# Altium PCB PDBMCU.PcbDoc (part 3 of 3)
Units mil, origin at the board's own origin, x right, y up, seen from the top; angles counter-clockwise.
Board outline 5245 x 4685 mil, 4 copper layers (Top Layer, Second Layer, Third Layer, Bottom Layer), stack 60.674 mil thick; 139 components, 73 nets, 640 pads, 472 vias.
Unrouted connection lines stored in the file: 2.
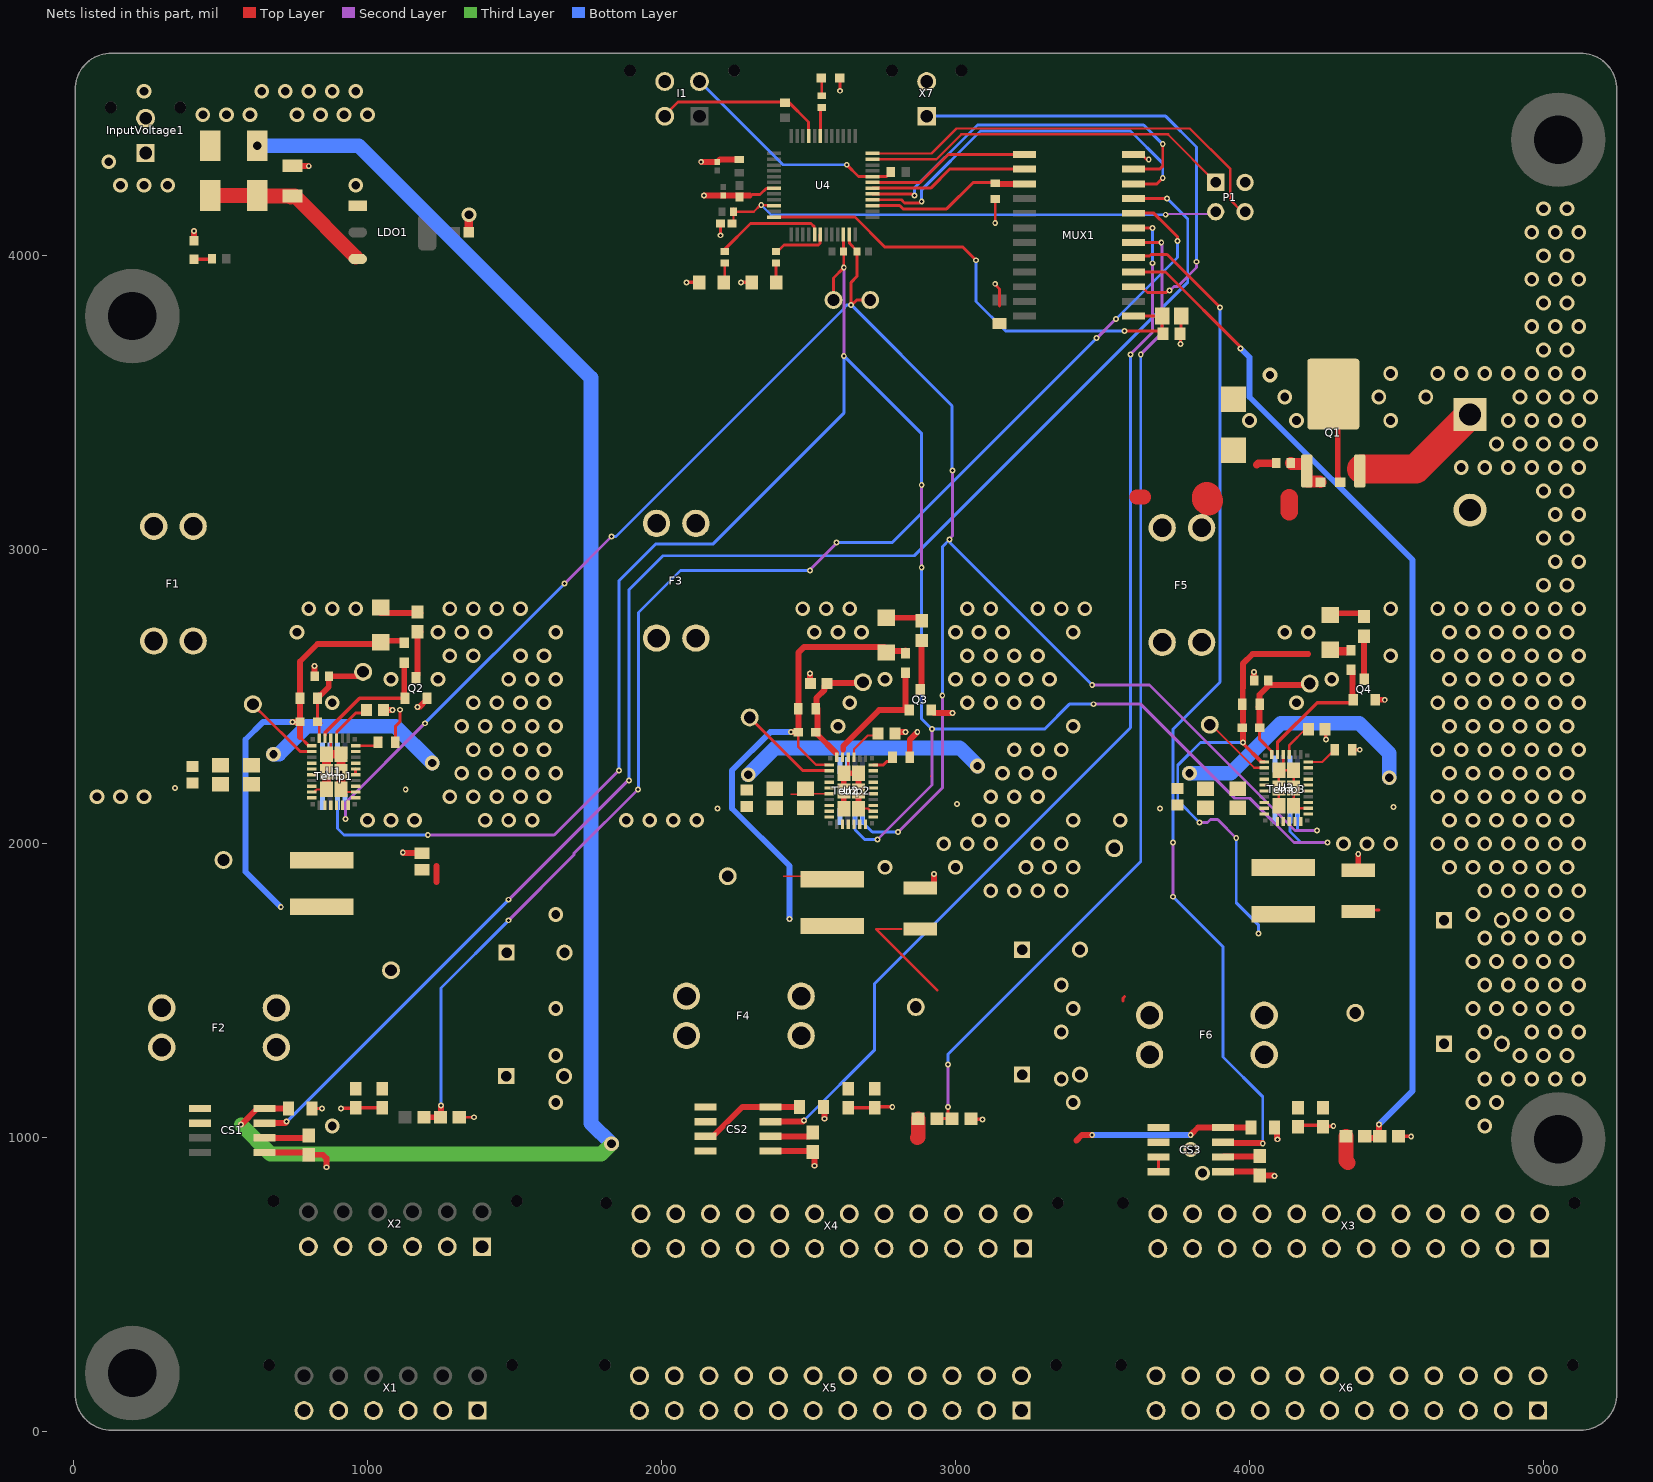
[diagram p4: the nets of this part, all layers, seen from the top]

## Via types
v1: diameter 50, hole 30, Top Layer to Bottom Layer, tented both sides, 342 vias
v2: diameter 20, hole 10, Top Layer to Bottom Layer, tented both sides, 123 vias
v3: diameter 50, hole 28, Top Layer to Bottom Layer, tented both sides, 7 vias

## Nets (pads, with @x,y where several pads share a name; then routed paths per layer and width w, separated by ;. In a path a pad name is that pad's centre, name@x,y a point inside that pad or via, vN(x,y) a via of type N, cw(c..) or ccw(c..) an arc to the next point about the centre after c; other vN are vias at no path point) (continued)
5V: C4.1 C5.1 C6.1 CS1.8 CS2.3 CS2.4 CS2.8 CS3.8 D2.1 R4.2 X4.P$13 X4.P$14 X4.P$15 X4.P$16 X4.P$17 X4.P$18 X4.P$19 X4.P$20 X4.P$21 X4.P$22 X4.P$23 X4.P$24 X5.P$13 X5.P$14 X5.P$15 X5.P$16 X5.P$17 X5.P$18 X5.P$19 X5.P$20 X5.P$21 X5.P$22 X5.P$23 X5.P$24 | length 6635.6
  Top Layer w20: v2(570,1045) 625,1100 CS1.8@650,1100 C4.1@730.71,1100 ; CS2.3@2150,1005 2175,1005 2275,1105 CS2.8@2370,1105 C5.1@2470,1105 ; 3410.58,990.58 3430,1010 v2(3465,1010) ; v2(3800,1010) 3825,1035 C6.1@4004.65,1035
  Top Layer w50: 2870,1000 2872.9,1002.9 R4.2@2872.9,1065
  Third Layer w50: v2(570,1045) 670,945 1795,945 v1(1830,980)
  Bottom Layer w20: v2(3465,1010) v2(3800,1010)
  Bottom Layer w50: v1(625,4374.65) 970.35,4374.65 1760,3585 1760,1050 v1(1830,980)
12V: CS3.3 CS3.4 R5.2 X3.P$13 X3.P$14 X3.P$15 X3.P$16 X3.P$17 X3.P$18 X3.P$19 X3.P$20 X3.P$21 X3.P$22 X3.P$23 X3.P$24 X6.P$13 X6.P$14 X6.P$15 X6.P$16 X6.P$17 X6.P$18 X6.P$19 X6.P$20 X6.P$21 X6.P$22 X6.P$23 X6.P$24 | length 142.9
  Top Layer w10: CS3.4@3690.08,885 CS3.3@3690.08,935
  Top Layer w50: R5.2@4327.9,1005 4327.9,922.1 4335,915
Analog_In: C43.1 C44.2 MUX1.1 U4.12 | length 1721.1
  Top Layer w10: U4.12@2382.68,4131.73 2657.68,4131.73 2759.41,4030 3025,4030 v2(3070,3985) ; v2(3575,3745) C44.2@3702.49,3745 ; MUX1.1@3605.04,3795 C43.1@3702.49,3795 C44.2@3702.49,3745 ; C44.2@3706.46,3735 3702.49,3738.97 C44.2@3702.49,3745
  Bottom Layer w10: v2(3070,3985) 3070,3845 3170,3745 v2(3575,3745)
CS_1: CS1.7 MUX1.9 | length 5133.4
  Top Layer w10: MUX1.9@3605.04,4195 v2(3720,4195)
  Top Layer w20: CS1.7@650.98,1050 720,1050 v2(725,1055)
  Second Layer w10: v2(1480,1810) 1883.09,2213.09 1888.09,2213.09 v2(1890,2215)
  Bottom Layer w10: v2(725,1055) v2(1480,1810) ; v2(1890,2215) 1890,2865 2005,2980 2860,2980 3790,3910 3790,4125 v2(3720,4195)
CS_2: CS2.7 MUX1.7 | length 3708.3
  Top Layer w10: MUX1.7@3605.04,4095 v2(3670,4095)
  Top Layer w20: CS2.7@2370,1055 2480.76,1055 v2(2484.79,1059.03)
  Second Layer w10: v2(3595,3665) 3595,3665.36 3670,3740.36 v2(3670,3975)
  Bottom Layer w10: v2(2484.79,1059.03) 2725,1299.24 2725,1525 3595,2395 v2(3595,3665) ; v2(3670,3975) v2(3670,4095)
CS_3: CS3.7 MUX1.5 | length 3545.5
  Top Layer w10: MUX1.5@3605.04,3995 3609.8,3999.76 3659.41,3999.76 3664.64,4005 3720,4005 v2(3900,3825)
  Top Layer w20: CS3.7@3910.55,985 3913.05,982.5 v2@4045,982.5
  Second Layer w10: v2(3740,1820) v2(3740,2005)
  Bottom Layer w10: v2(3740,1820) 3910,1650 3910,1275 4045,1140 v2(4045,981.26) ; v2(3740,2005) 3740,2390 3900,2550 v2(3900,3825)
Enable: MUX1.15 R32.2 U4.27 | length 560.8
  Top Layer w10: U4.27@2717.32,4171.1 2810.1,4171.1 2821.2,4160 2970,4160 3060,4250 3130.59,4250 R32.2@3135,4245.59
  Top Layer w20: R32.2@3135.59,4245 MUX1.15@3234.96,4245
GND: "PWR GOOD1.1" BLED1.1 C1.2 C2.2 C3.2 C4.2 C5.2 C6.2 C7.1 C8.2 C9.2 C10.2 C11.2 C12.2 C13.2 C14.2 C16.1 C17.1 C18.2 C19.2 C20.2 C21.2 C22.2 C23.2 C24.2 C26.1 C27.1 C28.2 C29.2 C30.2 C31.2 C32.2 C33.2 C34.2 C36.1 C37.2 C38.1 C39.2 C40.2 C41.1 C42.1 C43.2 C44.1 C45.1 C46.2 CS1.5 CS2.5 CS3.5 D1.2 GLED1.1 I1.P$4 InputVoltage1.P$2 LDO1.1 MUX1.12 P1.2 Q1.3 Q2.2 Q3.2 Q4.2 R2.2 R6.1 R7.1 R8.1 R10.1 R11.1 R15.1 R16.1 R20.1 R21.1 R32.1 RLED1.1 Temp1.4 Temp1.5 Temp1.6 Temp1.7 Temp2.4 Temp2.5 Temp2.6 Temp3.4 Temp3.5 Temp3.7 U1.8 U1.9 U1.10 U1.17 U1.18 U1.19 U1.30 U1.33 U1.34 U1.35 U1.36 U1.37 U1.38 U2.8 U2.9 U2.10 U2.17 U2.18 U2.19 U2.30 U2.33 U2.34 U2.35 U2.36 U2.37 U2.38 U3.8 U3.9 U3.10 U3.17 U3.18 U3.19 U3.30 U3.33 U3.34 U3.35 U3.36 U3.37 U3.38 U4.7 X1.P$1 X1.P$2 X1.P$3 X1.P$4 X1.P$5 X1.P$6 X2.P$1 X2.P$2 X2.P$3 X2.P$4 X2.P$5 X2.P$6 X3.P$1 X3.P$2 X3.P$3 X3.P$4 X3.P$5 X3.P$6 X3.P$7 X3.P$8 X3.P$9 X3.P$10 X3.P$11 X3.P$12 X4.P$1 X4.P$2 X4.P$3 X4.P$4 X4.P$5 X4.P$6 X4.P$7 X4.P$8 X4.P$9 X4.P$10 X4.P$11 X4.P$12 X5.P$1 X5.P$2 X5.P$3 X5.P$4 X5.P$5 X5.P$6 X5.P$7 X5.P$8 X5.P$9 X5.P$10 X5.P$11 X5.P$12 X6.P$1 X6.P$2 X6.P$3 X6.P$4 X6.P$5 X6.P$6 X6.P$7 X6.P$8 X6.P$9 X6.P$10 X6.P$11 X6.P$12 X7.P$2 | length 4631.6
  Top Layer w8: U1.9@810.31,2176.29 U1.9@810.5,2176.1 821,2176.1 822.5,2177.6 822.5,2180.31 827.19,2185 U1.37@860,2185 ; U1.33@860,2305 875.16,2320.16 U1.30@875.16,2359 ; U1.38@910,2185 918.9,2176.1 U1.18@959.5,2176.1 ; U2.37@2611.1,2111.1 U2.37@2620,2120 ; U2.35@2620,2175.85 2622.52,2178.37 U2.35@2620,2180.89 ; U2.33@2620,2240 2635.16,2255.16 U2.30@2635.16,2294 ; U2.38@2670,2120 2702.81,2120 2707.5,2115.31 2707.5,2112.6 2709,2111.1 U2.18@2719.5,2111.1 ; v2(3135,4111.88) R32.1@3135,4193.36 R32.1@3135,4194.41 ; U3.37@4091.1,2121.1 U3.37@4100,2130 v2(4100,2190) U3.33@4100,2250 ; U3.30@4115.16,2304 4115.16,2265.16 U3.33@4100,2250 ; U3.18@4199.5,2121.1 4158.9,2121.1 U3.38@4150,2130 v2(4150,2190) U3.34@4150,2250 U3.33@4100,2250
  Top Layer w10: C7.1@396.46,2215 C7.1@405,2206.46 ; C9.2@610,2210.32 C9.2@610.32,2210 ; C4.2@811.42,1100 v2(845,1100) ; R10.1@1084.68,2345 R10.1@1094.53,2354.84 ; R10.1@1094.53,2345 R10.1@1094.53,2354.84 ; v2(1110,2456.11) 1110,2415.15 1094.76,2399.91 1094.76,2355.08 R10.1@1094.53,2354.84 ; R6.1@1327.1,1070 v2(1362.1,1070) ; v2(2200,4070) 2200.35,4070.35 2200.35,4109.65 C41.1@2200.71,4110 ; 2307.41,4206.92 2308.75,4208.26 2335.38,4208.26 2356.37,4229.25 2381.77,4229.25 U4.7@2382.68,4230.16 ; v2(2606.5,4561.5) GLED1.1@2606.5,4605 ; v2(3135,3905) 3135,3902.29 3150,3887.29 3150,3829.29 ; MUX1.12@3632.6,4345 3650.28,4327.32 v2(3657.32,4327.32) ; C43.2@3763.54,3791.03 C43.2@3767.51,3795 ; v2(3765,3700) 3765,3733.54 C44.1@3763.54,3735 3767.51,3738.97 C43.2@3767.51,3791.03
  Top Layer w12: v2(910,1100) 957.56,1100 C13.2@960,1102.44 C12.2@1050,1102.44 ; v2(2085,3910) BLED1.1@2128.66,3910 ; v2(2270,3910) RLED1.1@2307.32,3910 ; C22.2@2635,1102.44 C23.2@2725,1102.44 2727.56,1105 v2(2785,1105) ; R7.1@3052.1,1065 3053.13,1063.97 3091.07,1063.97 v2(3092.21,1062.83) ; C32.2@4150.79,1042.44 C33.2@4250,1042.44 ; C33.2@4250,1037.44 4252.56,1040 v2(4285,1040) ; C36.1@4257.09,2390 4260,2387.09 v2(4260,2355) ; R20.1@4349.53,2320 v2(4375,2320) ; R8.1@4507.1,1005 v2(4550,1005)
  Top Layer w20: 410,4051.5 v2(410,4085) ; CS1.5@650.24,950 C1.2@788.97,950 ; C45.1@745,4306.18 798.82,4306.18 v2(800,4305) ; C1.2@800,942.49 848.28,942.49 860,930.77 v2(860,900) ; v2(820,2605) 820,2570.39 R11.1@820.39,2570 ; C16.1@1053.54,2455 v2(1085,2455) ; v2(1120,1970) 1121.41,1968.59 C14.2@1185,1968.59 ; v2(1170,2465) 1175.59,2465 1202.4,2491.81 Q2.2@1202.4,2495.16 ; C46.2@1343.64,4080 C46.2@1344.32,4080.68 ; v1@1344.32,4139.32 v1(1345,4140) ; v2(2135,4320) 2135.1,4319.9 C40.2@2190,4319.9 2190.55,4319.9 2198.29,4327.64 C39.2@2265,4327.64 ; v2(2145,4205) 2239.29,4205 2240,4205.71 ; 2240.61,4205.71 2300,4205.71 ; CS2.5@2370.24,955 2512.49,955 C2.2@2515,952.49 2520,947.49 v2(2520,905) ; C18.2@2377.49,2130 C18.2@2385,2122.49 C18.2@2392.51,2130 ; C19.2@2483.64,2130 C19.2@2489.41,2124.23 ; C19.2@2501.8,2123.36 C19.2@2503.44,2125 ; v2(2505,2580) 2505,2546.83 R16.1@2506.83,2545 ; C5.2@2550.71,1105 2555,1100.71 v2(2555,1065) ; U2.37@2620,2120 U2.35@2620,2175.85 ; U2.35@2620,2180.89 U2.33@2620,2240 U2.34@2670,2240 v2(2670,2180) U2.38@2670,2120 ; C26.1@2793.54,2375 2798.54,2380 v2(2830,2380) ; R15.1@2844.53,2295 2844.53,2354.53 v2(2870,2380) ; C24.2@2880,1849.88 2914.47,1849.88 2927.17,1862.58 v2(2927.17,1897.17) ; Q3.2@2917.4,2455.16 2917.4,2451.81 2923.19,2446.02 2926.54,2446.02 2927.56,2445 v2(2990,2445) ; MUX1.12@3605.04,4345 MUX1.12@3632.6,4345 ; C29.2@3852.49,2130 C29.2@3860,2122.49 ; CS3.5@3913.82,885.59 C3.2@4022.19,885.59 ; C28.2@3957.43,2120.95 C28.2@3962.93,2115.46 ; v2(4015,2585) 4015,2555.77 R21.1@4015.77,2555 ; C3.2@4035,872.49 4082.51,872.49 v2(4085,870) ; C6.2@4085.35,1035 4094.18,1026.18 4094.18,995.82 v2(4095,995) ; 4300,3406.26 4300,3247.46 4300.75,3246.72 4300.75,3235.75 4306.5,3230 R2.2@4308.46,3230 R2.2@4311.5,3230 ; C34.2@4370,1909.88 v2(4370,1965) ; Q4.2@4427.4,2490.16 4427.56,2490 v2(4460,2490)
  Top Layer w30: U1.37@860,2185 v2(860,2245) U1.33@860,2305 U1.34@910,2305 v2(910,2245) U1.38@910,2185 ; C46.2@1344.32,4080.68 v1@1344.32,4139.32
  other v1: 3840,880 3800,960 880,1040 4800,1040 1640,1120 3400,1120 4760,1120 4840,1120 3360,1200 4800,1200 4880,1200 4960,1200 5040,1200 5120,1200 1640,1280 4760,1280 4920,1280 5000,1280 5080,1280 3360,1360 4800,1360 4960,1360 5040,1360 5120,1360 1640,1440 3400,1440 4760,1440 4840,1440 4920,1440 5000,1440 5080,1440 3360,1520 4800,1520 4880,1520 4960,1520 5040,1520 5120,1520 4760,1600 4840,1600 4920,1600 5000,1600 5080,1600 4800,1680 4880,1680 4960,1680 5040,1680 5120,1680 1640,1760 4760,1760 4920,1760 5000,1760 5080,1760 3120,1840 3200,1840 3280,1840 3360,1840 4800,1840 4880,1840 4960,1840 5040,1840 5120,1840 2760,1920 3000,1920 3240,1920 3320,1920 3400,1920 4680,1920 4760,1920 4840,1920 4920,1920 5000,1920 5080,1920 2960,2000 3040,2000 3120,2000 3280,2000 3360,2000 4320,2000 4400,2000 4480,2000 4640,2000 4720,2000 4800,2000 4880,2000 4960,2000 5040,2000 5120,2000 1000,2080 1080,2080 1160,2080 1400,2080 1480,2080 1560,2080 1880,2080 1960,2080 2040,2080 2120,2080 3080,2080 3160,2080 3400,2080 3560,2080 4680,2080 4760,2080 4840,2080 4920,2080 5000,2080 5080,2080 80,2160 160,2160 240,2160 1280,2160 1360,2160 1440,2160 1520,2160 1600,2160 3120,2160 3200,2160 3280,2160 4640,2160 4720,2160 4800,2160 4880,2160 4960,2160 5040,2160 5120,2160 1320,2240 1400,2240 1480,2240 1560,2240 1640,2240 3160,2240 3240,2240 3320,2240 4680,2240 4760,2240 4840,2240 4920,2240 5000,2240 5080,2240 1360,2320 1440,2320 1520,2320 1600,2320 3200,2320 3280,2320 3360,2320 4640,2320 4720,2320 4800,2320 4880,2320 4960,2320 5040,2320 5120,2320 1320,2400 1400,2400 1480,2400 1560,2400 1640,2400 2600,2400 3400,2400 4680,2400 4760,2400 4840,2400 4920,2400 5000,2400 5080,2400 880,2480 1360,2480 1440,2480 1520,2480 1600,2480 2640,2480 3040,2480 3120,2480 3200,2480 3280,2480 4160,2480 4640,2480 4720,2480 4800,2480 4880,2480 4960,2480 5040,2480 5120,2480 1080,2560 1240,2560 1480,2560 1560,2560 1640,2560 2760,2560 3000,2560 3080,2560 3160,2560 3240,2560 3320,2560 4280,2560 4680,2560 4760,2560 4840,2560 4920,2560 5000,2560 5080,2560 1280,2640 1360,2640 1520,2640 1600,2640 3040,2640 3120,2640 3200,2640 3280,2640 4480,2640 4640,2640 4720,2640 4800,2640 4880,2640 4960,2640 5040,2640 5120,2640 760,2720 1240,2720 1320,2720 1400,2720 1640,2720 2520,2720 2600,2720 2680,2720 3000,2720 3080,2720 3160,2720 3400,2720 4120,2720 4200,2720 4680,2720 4760,2720 4840,2720 4920,2720 5000,2720 5080,2720 800,2800 880,2800 960,2800 1280,2800 1360,2800 1440,2800 1520,2800 2480,2800 2560,2800 2640,2800 3040,2800 3120,2800 3280,2800 3360,2800 3440,2800 4480,2800 4640,2800 4720,2800 4800,2800 4880,2800 4960,2800 5040,2800 5120,2800 5000,2880 5080,2880 5040,2960 5120,2960 5000,3040 5080,3040 5040,3120 5120,3120 5000,3200 5080,3200 4720,3280 4800,3280 4880,3280 4960,3280 5040,3280 5120,3280 4840,3360 4920,3360 5000,3360 5080,3360 5160,3360 4000,3440 4160,3440 4480,3440 4880,3440 4960,3440 5040,3440 5120,3440 4120,3520 4440,3520 4600,3520 4920,3520 5000,3520 5080,3520 5160,3520 4480,3600 4640,3600 4720,3600 4800,3600 4880,3600 4960,3600 5040,3600 5120,3600 5000,3680 5080,3680 4960,3760 5040,3760 5120,3760 5000,3840 5080,3840 4960,3920 5040,3920 5120,3920 5000,4000 5080,4000 4960,4080 5040,4080 5120,4080 5000,4160 5080,4160 160,4240 240,4240 320,4240 960,4240 120,4320 440,4480 520,4480 600,4480 760,4480 840,4480 920,4480 1000,4480 240,4560 640,4560 720,4560 800,4560 880,4560 960,4560
  other v2: 2190,2120 3695,2120 4490,2125 3005,2135 2620,2180 1129.82,2184.82 345,2190
  other v3: 4070,3595
I2C_SCL: I1.P$2 R25.2 U4.45 | length 585.9
  Top Layer w10: I1.P$2@2010,4476.89 2056.16,4523.05 R25.2@2405,4523.05 ; R25.2@2405,4524.41 2405.28,4524.13 2430.87,4524.13 2500.01,4454.99 2500.01,4408.1 U4.45@2500.79,4407.32
I2C_SDA: I1.P$3 R30.2 U4.32 | length 793.7
  Top Layer w10: v2(2630,4310) 2670.47,4269.53 U4.32@2717.32,4269.53 2765.91,4269.53 2779.41,4283.03 R30.2@2779.41,4285
  Bottom Layer w10: I1.P$3@2128.12,4595 2413.12,4310 v2(2630,4310)
NetBLED1_2: BLED1.2 R27.1 | length 61.5
  Top Layer w10: BLED1.2@2211.34,3910 2215,3913.66 R27.1@2215,3970
NetC1_1: C1.1 CS1.6 | length 153.1
  Top Layer w20: CS1.6@650,1000 792.49,1000 C1.1@800,1007.51
NetC2_1: C2.1 CS2.6 | length 153.3
  Top Layer w20: CS2.6@2370,1005 2503.97,1005 2515,1016.03 C2.1@2515,1019.79
NetC3_1: C3.1 CS3.6 | length 125.7
  Top Layer w20: CS3.6@3910.32,935 3911.57,936.26 4033.74,936.26 C3.1@4035,937.51
NetC7_2: C7.2 C8.1 C9.1 F1.1 U1.4 U1.5 U1.6 U1.21 U1.22 U1.23 U1.25 | length 650.8
  Top Layer w10: U1.21@959.5,2235.16 U1.22@959.5,2254.84
  Bottom Layer w50: v3(680,2305) 698.64,2305 793.64,2400 1095,2400 v3(1220,2275)
NetC10_1: C10.1 C11.1 C12.1 C13.1 C14.1 C15.1 F2.1 L1.2 LED1.2 OUT1.1 R9.2 R12.2 U1.1 | length 1539.8
  Top Layer w10: 770.47,2363.11 800,2333.58 U1.1@810.5,2333.58
  Top Layer w20: v2(745,2415) C15.1@770.47,2415 ; 770.47,2363.11 C15.1@770.47,2415 ; LED1.2@1036.21,2680 830,2680 770.47,2620.47 R9.2@770.47,2495 C15.1@770.47,2415 ; LED1.2@1065,2690.72 R12.2@1120,2690.72 ; 1235,1870 1235,1925
  Bottom Layer w20: v2(705,1785) 585,1905 585,2354.61 645.39,2415 v2(745,2415)
NetC15_2: C15.2 FB1.1 R9.1 R11.2 U1.32 | length 309.7
  Top Layer w10: C15.2@830,2415.47 830,2475 ; U1.32@835.79,2369.5 C15.2@835.79,2410
  Top Layer w12: C15.2@836.45,2415 C15.2@841.45,2410
  Top Layer w20: R9.1@829.53,2495 829.53,2499.92 834.29,2504.69 839.21,2504.69 868.27,2533.74 R11.2@868.27,2563.27 ; R11.2@869.61,2570 FB1.1@985,2570
NetC16_2: C16.2 U1.29 | length 144.4
  Top Layer w10: U1.29@894.84,2359 895.34,2359.5 895.34,2380.34 960,2445 C16.2@991.46,2445
NetC17_2: C17.2 C18.1 C19.1 F3.1 U2.4 U2.5 U2.6 U2.21 U2.22 U2.23 U2.25 | length 975
  Top Layer w5: 2439.92,2168.41 C19.1@2497.22,2168.41 ; C19.1@2496.63,2170.16 U2.6@2570.5,2170.16 ; 2914.49,2230.51 2915,2230
  Bottom Layer w50: v3(2295,2235) 2386.16,2326.16 3013.84,2326.16 v3(3075,2265)
NetC20_1: C20.1 C21.1 C22.1 C23.1 C24.1 C25.1 F4.1 L2.2 LED2.2 OUT2.1 R14.2 R17.2 U2.1 | length 2072.5
  Top Layer w8: C25.1@2465.47,2380 2465.47,2329.53 2526.42,2268.58 U2.1@2570.5,2268.58 ; 2815.15,1710.15 2729.85,1710.15 2937.5,1502.5
  Top Layer w20: v2(2440,2380) C25.1@2464.49,2380 ; C25.1@2465.47,2380 R14.2@2465.47,2460 2465.47,2650.47 2485,2670 LED2.2@2759.06,2670 ; LED2.2@2759.06,2645 LED2.2@2765,2650.94 2770.39,2656.33 2827.87,2656.33 R17.2@2830,2658.46
  Bottom Layer w20: v2(2435,1745) 2435,1925 2240,2120 2240,2250 2370,2380 v2(2440,2380)
NetC25_2: C25.2 FB2.1 R14.1 R16.2 U2.32 | length 396.2
  Top Layer w10: U2.32@2593.97,2308.14 2595.29,2306.83 2595.29,2294.5 U2.32@2595.79,2294
  Top Layer w20: R14.1@2524.53,2460 2524.53,2464.92 2526.83,2467.23 2526.83,2496.6 2554.76,2524.52 2554.76,2536.59 R16.2@2563.17,2545 2565.67,2547.5 FB2.1@2657.5,2547.5 ; R14.1@2524.62,2464.67 R14.1@2529.29,2460 ; R14.1@2530.07,2460 2530.07,2380 2530.28,2379.8 2530.28,2371.84 U2.32@2593.97,2308.14
NetC26_2: C26.2 U2.29 | length 136.6
  Top Layer w8: U2.29@2654.84,2294 2654.84,2321.56 2701.61,2368.33 2721.76,2368.33 2736.46,2383.03 C26.2@2736.46,2385
NetC27_2: C27.2 C28.1 C29.1 F5.1 U3.4 U3.5 U3.6 U3.21 U3.22 U3.23 U3.25 | length 875
  Bottom Layer w50: v3(3796,2240) 3936.16,2240 4106.16,2410 4373.64,2410 4475,2308.64 v3(4475,2225)
NetC30_1: C30.1 C31.1 C32.1 C33.1 C34.1 C35.1 F6.1 L3.2 LED3.2 OUT3.1 R19.2 R22.2 U3.1 | length 1735.2
  Top Layer w10: 4430,1775 4440,1775
  Top Layer w12: v2(3977.52,2345) 3979.05,2343.47 3979.05,2340.53 4041,2278.58 U3.1@4050.5,2278.58
  Top Layer w20: C35.1@3971.02,2390.24 3977.52,2390.24 v2(3977.52,2345) ; C35.1@3977.52,2396.31 C35.1@3977.52,2405.65 ; 3977.52,2415.65 3977.52,2424.77 3977.19,2425.09 3977.52,2425.42 R19.2@3977.52,2465 ; 3977.52,2455 3977.52,2470 3977.52,2489.26 3977.19,2489.59 3977.19,2530.41 3977.52,2530.74 3977.52,2612.52 4010.23,2645.23 4200,2645.23 ; LED3.2@4275,2650.23 R22.2@4330,2650.23 ; LED3.2@4275,2660.23 4330,2660.23 4341.3,2660.23 R22.2@4346.54,2655
  Second Layer w10: v2(3830.36,2072.79) 3857.59,2072.79 3867.23,2082.43 3891.75,2082.43 3954.18,2020 v2(3955,2020)
  Bottom Layer w10: v2(3830.36,2072.79) 3756,2147.16 3756,2267.57 3833.43,2345 v2(3977.52,2345) ; v2(3955,2020) 3955,1800 4030,1725 v2(4030,1695)
NetC35_2: C35.2 FB3.1 R19.1 R21.2 U3.32 | length 399.9
  Top Layer w10: C35.2@4034.53,2405 4034.53,2355.76 4075.79,2314.5 U3.32@4075.79,2304
  Top Layer w20: R19.1@4029.76,2465 4034.07,2469.3 4034.07,2507.34 4062.26,2535.53 ; C35.2@4034.53,2405 R19.1@4034.53,2465 ; R21.2@4064.23,2540 4195,2540 FB3.1@4200,2545
NetC36_2: C36.2 U3.29 | length 115.9
  Top Layer w8: U3.29@4134.84,2304 4134.84,2334.84 C36.2@4195,2395
NetC45_2: C45.2 D2.2 D3.2 LDO1.3 | length 571.5
  Top Layer w50: D3.2@465,4205.35 D2.2@625,4205.35 626.88,4203.47 C45.2@729.65,4203.47 ; C45.2@735.12,4203.82 C45.2@738.46,4200.47 ; C45.2@745,4203.82 752.52,4203.82 LDO1.3@960.31,3996.03
NetCS1_1: CS1.1 CS1.2 F2.2
NetCS2_1: CS2.1 CS2.2 F4.2
NetCS3_1: CS3.1 CS3.2 F6.2 | length 17.1
  Top Layer w10: 3570,1465 3570,1475 3575,1480
NetD1_1: D1.1 F1.2 F3.2 F5.2 J1.2 R1.1 | length 164.6
  Top Layer w25: 4025,3290 4030,3295 R1.1@4091.54,3295
  Top Layer w50: 3616,3180 3640.5,3180
  Top Layer w60: 4135,3130.19 4135,3177.83
  Top Layer w80: J1.2@4743.84,3128.84 J1.2@4750,3135
  Top Layer w100: 3855,3180 3855,3172.7 3860.5,3167.2
NetD3_1: D3.1 InputVoltage1.P$1
NetGLED1_2: GLED1.2 R24.2 | length 62.5
  Top Layer w10: GLED1.2@2543.5,4605 2545,4603.5 R24.2@2545,4543.17
NetINTVCC1_1: INTVCC1.1 U1.2 | length 272.9
  Top Layer w10: INTVCC1.1@596.13,2455.24 628.57,2455.24 633.49,2450.32 634.68,2450.32 771.1,2313.9 U1.2@810.5,2313.9
NetINTVCC2_1: INTVCC2.1 U2.2 | length 345.5
  Top Layer w10: INTVCC2.1@2300,2430 2481.1,2248.9 U2.2@2570.5,2248.9
NetINTVCC3_1: INTVCC3.1 U3.2 | length 246
  Top Layer w8: INTVCC3.1@3865,2405 3870,2405 4016.1,2258.9 U3.2@4050.5,2258.9
NetJ1_1: J1.1 Q1.2 | length 444.7
  Top Layer w100: Q1.2@4381.97,3275 4565,3275 J1.1@4750,3460
NetL1_1: L1.1 SW1.1 U1.12 U1.13 U1.14 U1.15 U1.16 | length 0.7
  Top Layer w10: L1.1@839.53,1960 L1.1@840,1959.53
NetL2_1: L2.1 SW2.1 U2.12 U2.13 U2.14 U2.15 U2.16 | length 102.2
  Top Layer w5: 2414.88,1890 L2.1@2495,1890 ; L2.1@2490,1890 L2.1@2495,1890 ; L2.1@2490,1890 L2.1@2495,1890 ; L2.1@2490,1890 L2.1@2495,1890
  Top Layer w10: L2.1@2490,1895 L2.1@2495,1890
NetL3_1: L3.1 SW3.1 U3.12 U3.13 U3.14 U3.15 U3.16
NetLED1_1: LED1.1 R13.2 | length 150.1
  Top Layer w10: R13.2@1170,2788.46 R13.2@1180,2798.46
  Top Layer w20: LED1.1@1044.06,2785 R13.2@1180,2785
NetLED2_1: LED2.1 R18.2 | length 124.4
  Top Layer w20: LED2.1@2765,2769.06 2874.41,2769.06 R18.2@2885,2758.46
NetLED3_1: LED3.1 R23.2 | length 129.5
  Top Layer w20: LED3.1@4275,2778.11 4281.28,2784.39 4382.14,2784.39 4395,2771.54 R23.2@4395,2770
NetMUX1_3: MUX1.3 X7.P$1 | length 1630.1
  Top Layer w10: MUX1.3@3605.04,3895 3632.6,3895 3652.6,3875 3716.94,3875 3724.62,3882.68 v2(3727.32,3882.68)
  Second Layer w10: v2(3727.32,3882.68) 3730.03,3882.68 3743.56,3896.21 3756.21,3896.21 3820,3960 v2(3820,3980)
  Bottom Layer w10: X7.P$1@2901.89,4474.88 2902.01,4475 3715,4475 3820,4370 v2(3820,3980)
"NetPWR GOOD1_2": "PWR GOOD1.2" R33.2 | length 61
  Top Layer w12: 410,3988.5 468.9,3988.5 R33.2@470.39,3990
NetQ1_1: Q1.1 R1.2 R2.1 | length 132.1
  Top Layer w40: R1.2@4140,3295 4142.99,3292.01 Q1.1@4187.99,3292.01 ; Q1.1@4194.84,3268.19 4194.84,3233.39 4195.75,3232.48 4239.06,3232.48 R2.1@4241.54,3230
NetQ2_1: Q2.1 R12.1 U1.31 | length 457
  Top Layer w8: U1.31@855.47,2359 U1.31@855.47,2369.91
  Top Layer w12: U1.31@855.47,2369.91 855.47,2377.79 972.84,2495.16 Q2.1@1127.6,2495.16
  Top Layer w20: R12.1@1125,2621.54 1125,2507.76 Q2.1@1127.6,2505.16
NetQ2_3: Q2.3 R13.1 | length 150.8
  Top Layer w20: Q2.3@1170,2574.84 1170,2711.54 R13.1@1180,2721.54
NetQ3_1: Q3.1 R17.1 U2.31 | length 436.7
  Top Layer w8: U2.31@2615.47,2294 2616.97,2295.5 2616.97,2319.94 2617.96,2320.93
  Top Layer w20: 2617.96,2320.93 2617.96,2332.96 2740.16,2455.16 2830,2455.16 Q3.1@2842.6,2455.16 ; Q3.1@2830,2460.03 R17.1@2830,2581.54
NetQ3_3: Q3.3 R18.1 | length 146.3
  Top Layer w20: Q3.3@2884.51,2537.06 R18.1@2884.51,2683.41
NetQ4_1: Q4.1 R22.1 U3.31 | length 453.1
  Top Layer w10: U3.31@4095.47,2304 4095.47,2345.47
  Top Layer w12: 4095.47,2345.47 4230,2480 4342.81,2480 4352.6,2489.79 Q4.1@4352.6,2490.16
  Top Layer w20: R22.1@4350,2589.57 4350,2497.76 Q4.1@4351.81,2495.94
NetQ4_3: Q4.3 R23.1 | length 147.7
  Top Layer w20: Q4.3@4390,2559.84 R23.1@4390,2707.58
NetR10_2: R10.2 U1.26 | length 144.2
  Top Layer w8: U1.26@960,2334.08 1024.71,2334.08 1033.52,2342.89 R10.2@1033.52,2346.96 ; R10.2@1025.47,2345 1025.47,2355 R10.2@1033.24,2347.23 ; R10.2@1035.24,2345.24 R10.2@1033.52,2346.96 ; R10.2@1033.24,2347.23 R10.2@1033.52,2347.5 ; R10.2@1033.24,2347.23 R10.2@1033.52,2346.96 ; R10.2@1033.52,2346.96 R10.2@1033.52,2347.5 ; R10.2@1033.52,2347.5 1046.7,2360.69 1046.24,2360.69 1033.52,2347.96 R10.2@1033.52,2347.5
  Top Layer w10: U1.26@959.5,2333.58 U1.26@960,2334.08
NetR15_2: R15.2 U2.26 | length 72.3
  Top Layer w10: U2.26@2719.5,2268.58 2754.4,2268.58 2766.13,2280.31 2780.31,2280.31 R15.2@2785,2285
NetR20_2: R20.2 U3.26 | length 93.6
  Top Layer w8: U3.26@4199.5,2278.58 4247.56,2278.58 R20.2@4279.76,2310.79
NetR24_1: R24.1 U4.43 | length 100
  Top Layer w10: U4.43@2540.16,4407.32 2540.16,4500.47 R24.1@2545,4505.31
NetR27_2: R27.2 U4.17 | length 384.7
  Top Layer w10: R27.2@2215,4010 2215,4022.72 2302.28,4110 2508.55,4110 2519.57,4098.98 2519.57,4073.58 U4.17@2520.47,4072.68
NetR29_1: R29.1 RLED1.2 | length 62.4
  Top Layer w10: RLED1.2@2390,3910 R29.1@2390,3972.44
NetR29_2: R29.2 U4.18 | length 192.3
  Top Layer w10: R29.2@2391.97,4011.81 2391.97,4014.68 2398.78,4021.5 2401.65,4021.5 2416.73,4036.57 2533.39,4036.57 2539.25,4042.43 2539.25,4071.77 U4.18@2540.16,4072.68
NRST: C41.2 P1.3 R31.2 U4.10 | length 1765
  Top Layer w8: C41.2@2244.29,4115 2244.68,4115.39 R31.2@2244.68,4150 ; R31.2@2246.89,4157.8 2244.68,4160 R31.2@2244.68,4150 ; R31.2@2249.68,4150 R31.2@2244.68,4150 ; U4.10@2382.68,4171.1 2381.83,4171.95 2340,4171.95 v2(2339.15,4172.8) 2336.26,4172.8 2313.47,4150 R31.2@2244.68,4150
  Second Layer w8: v2(3715,4140) 3717.3,4142.3 3877.3,4142.3 P1.3@3885,4150
  Bottom Layer w8: v2(2339.15,4172.8) 2371.95,4140 v2(3715,4140)
S0: MUX1.10 U4.28 | length 1320.9
  Top Layer w10: U4.28@2717.32,4190.79 2815.87,4190.79 2826.66,4180 2877.29,4180 2882.29,4185 v2(2885,4185) ; MUX1.10@3605.04,4245 3685,4245 v2(3705,4265)
  Bottom Layer w10: v2(2885,4185) 2885,4225 3085,4425 3595,4425 3705,4315 v2(3705,4265)
S1: MUX1.11 U4.29 | length 1310.3
  Top Layer w10: U4.29@2717.32,4210.47 2851.82,4210.47 2857.29,4205 v2(2860,4205) ; MUX1.11@3605.04,4295 3695,4295 3705,4305 v2(3705,4380)
  Bottom Layer w10: v2(2860,4205) 2860,4230.42 3074.58,4445 3640,4445 v2(3705,4380)
S2: MUX1.14 U4.30 | length 544.5
  Top Layer w10: U4.30@2717.32,4230.16 2915.61,4230.16 2980.46,4295 MUX1.14@3234.96,4295
S3: MUX1.13 U4.31 | length 557.1
  Top Layer w10: U4.31@2717.32,4249.84 2880.3,4249.84 2975.46,4345 MUX1.13@3234.96,4345
SCL: R26.1 SCL1.1 Temp1.2 Temp2.2 Temp3.2 U4.22 | length 7278
  Top Layer w10: SCL1.1@2585,3850 2585,3925 2619.68,3959.68 2619.68,3960 2619.84,3960.16 2619.84,4014.84 R26.1@2619.68,4015 2619.29,4015.39 2619.29,4072.28 U4.22@2618.9,4072.68
  Second Layer w10: v2(1205,2030) 1635,2030 v2(1855,2250) ; v2(2620,3660) v2@2620,3955 ; v2(2735,2015) 2920,2200 v2(2920,2390) ; v2(2885,2940) v2(2885,3220) ; v2(3470,2475) 3630,2475 3950,2155 4000.92,2155 4150.92,2005 v2(4265,2005)
  Bottom Layer w10: Temp1.2@897.8,2143.39 897.8,2052.25 920.05,2030 v2(1205,2030) ; v2(1855,2250) 1855,2895 1979.19,3019.19 2174.19,3019.19 2620,3465 v2(2620,3660) 2885,3395 v2(2885,3220) ; Temp2.2@2657.8,2093.39 2657.8,2048.15 2690.95,2015 v2(2735,2015) ; v2(2885,2940) 2885,2425 v2(2920,2390) 3302.25,2390 3387.25,2475 v2(3470,2475) ; Temp3.2@4137.8,2098.39 4137.8,2042.2 4175,2005 v2(4265,2005)
  other v2: 2620,3960
SDA: R28.1 SDA1.1 Temp1.1 Temp2.1 Temp3.1 U4.23 | length 6814.5
  Top Layer w10: U4.23@2638.58,4072.68 2639.49,4071.77 2639.49,4042.8 2665.32,4016.97 R28.1@2665.32,4015 R28.1@2665.32,4013.03 ; R28.1@2665.32,4010 2665.32,3930.32 2645,3910 v2(2645,3833.37) 2647.1,3833.37 2663.73,3850 SDA1.1@2710,3850
  Second Layer w10: v2(925,2085) 925,2140 v2(1195,2410) ; v2(1670,2885) v2(1830,3045) ; v2(2805,2040) 2955,2190 v2(2955,2505) ; v2(2980,3035) 2980,3037.71 2990,3047.71 v2(2990,3270) ; v2(3465,2540) 3660,2540 4155,2045 v2(4230,2045)
  Bottom Layer w10: Temp1.1@923.39,2143.39 924.19,2142.58 924.19,2085.81 v2(925,2085) ; v2(1195,2410) v2(1670,2885) ; v2(1830,3045) 1830.5,3045.5 1844.86,3045.5 2617.18,3817.82 ccw(c2585,3850) 2624.96,3828.21 cw(c2633.71,3823.37) 2631.78,3833.18 2632.73,3833.37 v2(2645,3833.37) 2988.33,3490.04 2988.33,3271.67 v2(2990,3270) ; Temp2.1@2683.39,2093.39 2683.39,2073.7 2717.09,2040 v2(2805,2040) ; v2(2955,2505) 2955,3010 v2(2980,3035) 2981.91,3033.09 2981.91,3023.09 v2(3465,2540) ; Temp3.1@4163.39,2098.39 4163.39,2050.86 4169.24,2045 v2(4230,2045)
SWCLK: P1.4 U4.36 | length 1493.6
  Top Layer w8: U4.36@2717.32,4348.27 2918.27,4348.27 3003.27,4433.27 3796.73,4433.27 3935,4295 3935,4190 3975,4150 P1.4@3985,4150 ; P1.4@3983.12,4141.88 P1.4@3995,4141.88
SWDIO: P1.1 U4.35 | length 1271.8
  Top Layer w8: U4.35@2717.32,4328.58 2935,4328.58 3020,4413.58 3723.31,4413.58 3723.31,4411.69 P1.1@3885,4250
VS_1: MUX1.8 R3.1 R6.2 | length 4637
  Top Layer w10: MUX1.8@3605.04,4145 3605.33,4145.29 3674.35,4145.29 3718.47,4101.18 3754.64,4065 3754.64,4050.36 v2(3755,4050)
  Top Layer w20: R3.1@1192.1,1070 R6.2@1242.9,1070 ; R6.2@1247.9,1070 1250,1072.1 v2(1250,1110)
  Second Layer w10: v2(1480,1740) 1701.82,1961.82 1701.82,1966.82 v2(1920,2185) ; v2(2505,2930) 2505,2932.5 2595,3022.5 v2(2595,3025) ; v2(3480,3720) 3480.33,3720 3545.33,3785 v2(3545.67,3785)
  Bottom Layer w10: v2(1250,1110) 1250,1510 v2(1480,1740) ; v2(1920,2185) 1921.5,2186.5 1921.5,2786.5 2065,2930 v2(2505,2930) ; v2(2595,3025) 2785,3025 v2(3480,3720) ; v2(3545.67,3785) 3755.18,3994.51 3755.18,4049.82 v2(3755,4050)
VS_2: MUX1.6 R4.1 R7.2 | length 3420.5
  Top Layer w10: R4.1@2947.87,1066.08 2986.82,1066.08 2975,1077.9 v2(2975,1104.61) ; R7.2@2999.23,1063.92 R7.2@3000,1064.68 ; MUX1.6@3605.04,4045 v2(3700,4045)
  Second Layer w10: v2(2975,1104.61) v2(2975,1250) ; v2(3630,3665) 3701.63,3736.63 3701.63,4043.37 v2(3700,4045)
  Bottom Layer w10: v2(2975,1250) 2975,1285 3630,1940 v2(3630,3665)
VS_3: MUX1.4 R5.1 R8.2 | length 3472
  Top Layer w10: MUX1.4@3605.04,3945 3714.03,3945 3970,3689.03 v2(3970,3685)
  Top Layer w20: R5.1@4412.1,1000 R8.2@4437.9,1000 ; v2(4440,1045) 4440,1007.9 R8.2@4442.9,1005
  Bottom Layer w20: v2(3970,3685) 4000,3655 4000,3520.25 4555,2965.25 4555,1160 v2(4440,1045)
pads on no net: I1.1 InputVoltage1.1 MUX1.2 MUX1.16 MUX1.17 MUX1.18 MUX1.19 MUX1.20 MUX1.21 MUX1.22 MUX1.23 Temp1.3 Temp2.3 Temp3.3 U1.3 U1.7 U1.11 U1.20 U1.24 U1.27 U1.28 U1.39 U1.40 U1.41 U1.42 U2.3 U2.7 U2.11 U2.20 U2.24 U2.27 U2.28 U2.39 U2.40 U2.41 U2.42 U3.3 U3.7 U3.11 U3.20 U3.24 U3.27 U3.28 U3.39 U3.40 U3.41 U3.42 U4.1 U4.2 U4.3 U4.8 U4.9 U4.11 U4.13 U4.14 U4.15 U4.16 U4.19 U4.20 U4.21 U4.24 U4.25 U4.26 U4.33 U4.34 U4.37 U4.38 U4.39 U4.40 U4.41 U4.42 U4.44 U4.46 U4.47 U4.48 X1.1 X2.1 X3.1 X4.1 X5.1 X6.1 X7.1
copper on no net: | length 1.1
  Top Layer w10: 2460.64,4071.9 2461.42,4072.68

## Polygon pours and split planes (outlines as drawn)
GND on Top Layer "GND_L01_P001" (solid, pour order 1): 195,4420 285,4420 330.69,4465.69 330.69,4660 160,4660 160,4420
GND on Top Layer "GND_L01_P094" (solid, pour order 94): 910,4235 910,4135 1030,4135 1030,4660 320,4660 320,4545 600,4545
NetD3_1 on Top Layer "NETD3_1_L01_P023" (solid, pour order 23): 159.73,4410 159.73,4375.27 159.73,4302.5 387.5,4302.5 509.46,4302.5 509.46,4410
NetCS2_1 on Top Layer "NETCS2_1_L01_P037" (solid, remove dead copper, pour order 37): 2400,1030 1745,1030 1745,1780 2400,1780
3v3 on Top Layer "3V3_L01_P062" (solid, pour order 62): 1060,4630 1060,4140 100,4140 100,3655 4915,3655 4925,3665 4919.08,4630
NetCS3_1 on Top Layer "NETCS3_1_L01_P036" (solid, pour order 36): 3975,1070 3805,1070 3805,1035 3730,960 3485,960 3485,1830 3975,1830
NetL3_1 on Top Layer "+3v3_L01_P-001" (solid, pour order 15): 4085,2085 4085,2035 3485,2035 3485,1845 4250,1845 4260,1855 4260,1965 4180,2045 4180,2085
GND on Top Layer "GND_L01_P095" (solid, pour order 95): 3670,2155 4070,2155 4070,2090 3670,2090
NetC30_1 on Top Layer "+3v3_L01_P-001" (solid, remove dead copper, pour order 16): 4710,1070 3990,1070 3990,1820 4710,1820
12V on Top Layer "12V_L01_P087" (solid, pour order 87): 4130,815 4130,950 4830,950 4965,815 5180,815 5180,35 3485,35 3485,950 3730,950 3730,880 3731,880 3780,815
NetCS1_1 on Top Layer "NETCS1_1_L01_P047" (solid, pour order 47): 500,1025 605,1130 605,1840 35,1840 35,1025
5V on Top Layer "5V_L01_P069" (solid, pour order 69): 2610,890 2610,1020 3455,1020 3455,890 3455,30 1750,30 1750,1020 2200,1020 2200,940 2201,940 2251,890
3.3V on Top Layer "3.3V_L01_P067" (solid, pour order 67): 925,905 925,1015 1700,1015 1700,30 35,30 35,1015 475,1015 475,980 550,905
NetC27_2 on Top Layer "NETC27_2_L01_P021" (solid, pour order 21): 4070,2170 3980,2170 3550,2170 3490,2230 3490,2845 4010,2845 4010,2675 3940,2605 3940,2230 4000,2230 4070,2230
GND on Top Layer "GND_L01_P092" (solid, pour order 92): 2170,2150 2540,2150 2550,2140 2590,2140 2590,2080 2170,2080
NetC20_1 on Top Layer "NETC20_1_L01_P032" (solid, pour order 32): 3325,1140 2420,1140 2420,1770 3325,1770
NetC10_1 on Top Layer "NETC10_1_L01_P007" (solid, pour order 7): 1570,1140 625,1140 625,1840 1040,1840 1040,1935 1570,1935
NetL2_1 on Top Layer "NETL2_1_L01_P033" (solid, pour order 33): 1745,2005 1745,1790 2705,1790 2720,1805 2720,2020 2705,2035 2705,2070 2700,2075 2605,2075 2605,2030 2580,2005
GND on Top Layer "GND_L01_P091" (solid, pour order 91): 320,2230 655,2230 680,2205 830,2205 830,2150 320,2150
NetD1_1 on Top Layer "NETD1_1_L01_P064" (solid, pour order 64): 4145,3205 4935,3205 4935,2860 30.42,2860 30.42,3610 3740,3610
NetC17_2 on Top Layer "Top Layer-NetC16_1" (solid, pour order 34): 2410,2835 1745,2835 1745,2410 1990,2165 2590,2165 2590,2235 2410,2235
NetC17_2 on Top Layer "NETC17_2_L01_P035" (solid, pour order 35): 2700,2260 2700,2165 2785,2165 3065,2165 3120,2220 3120,2285 3105,2300 2968.75,2300 2900,2260
NetC27_2 on Top Layer "NETC27_2_L01_P090" (solid, pour order 90): 4185,2265 4185,2175 4510,2175 4510,2290 4375,2290 4350,2265
NetC7_2 on Top Layer "NETC7_2_L01_P011" (solid, pour order 11): 710,2340 775,2275 835,2275 835,2235 735,2235 85,2235 35,2285 35,2845 710,2845
NetC7_2 on Top Layer "NETC7_2_L01_P008" (solid, pour order 8): 935,2225 935,2315 1260,2315 1260,2240 995,2240 980,2225
NetL1_1 on Top Layer "NETL1_1_L01_P006" (solid, pour order 6): 935,2145 945,2135 945,2075 1030,1990 1030,1865 35,1865 35,2105 845,2105 845,2145
GND on Top Layer "GND_L01_P089" (solid, pour order 89): 4535,3640 3900,3640 3900,3510 4026.87,3365 4535,3365
GND on Top Layer "GND_L01_P055" (solid, pour order 55): 945,2135 1170,2135 1170,2145 1170,2200 1150,2220 987.5,2220 987.5,2197.5 985,2195 945,2195
GND on Top Layer "GND_L01_P049" (solid, pour order 49): 2700,2150 2800,2150 2810,2160 3025,2160 3025,2065 2700,2065
GND on Top Layer "GND_L01_P022" (solid, pour order 22): 4180,2150 4225,2150 4510,2150 4510,2080 4185,2080 4180,2085
GND on Bottom Layer "GND_L04_P058" (solid, pour order 58): 1720,625.81 1720,27.5 37.82,27.5 37.82,3340 332.82,3635 5197.82,3635 5197.82,3270 1944.32,3270 1720,3048.69
GND on Bottom Layer "GND_L04_P057" (solid, pour order 57): 3732.5,2835 3462.5,2565 3462.5,27.5 1735,27.5 1735,3020 1945,3230 3947.5,3230 4302.5,3585 5202.5,3585 5207.5,3580 5207.5,3280 4672.5,3280 4227.5,2835
GND on Bottom Layer "GND_L04_P056" (solid, pour order 56): 3495,2568.09 3720.22,2790 4210,2790 4570,3145 4570,3570 5195,3570 5195,22.98 3495,28.09
GND on Bottom Layer "GND_L04_P061" (solid, pour order 61): 5195,4125 4679.72,4647 90,4651.5 90,3655 4185,3655 4565,3275 5195,3275
GND on Second Layer "GND_L02_P076" (solid, pour order 76): 1712.18,596.25 1712.18,27.5 30,27.5 30,3310.44 325,3605.44 5190,3605.44 5190,3240.44 1987.29,3240.44 1712.18,2969.03
GND on Second Layer "Second Layer-GND" (solid, pour order 86): 4490,2800 4490,3610 3760,3610 3760,3230 2030,3230 1745,2945 1745,27.5 3465,27.5 3465,2640 3640,2800
GND on Second Layer "GND_L02_P078" (solid, pour order 78): 3480,2552.79 3695.37,2765 3958.12,2765 4225,3028.17 4225,3610 5180,3610 5180,27.83 3480,32.94
GND on Second Layer "GND_L02_P081" (solid, pour order 81): 5180,4100 4644.75,4642.23 75,4646.71 75,3630 4170,3630 4550,3250 5180,3250
GND on Third Layer "GND_L03_P080" (solid, pour order 80): 1705,600.81 1705,32.5 22.82,32.5 22.82,3315 317.82,3610 5182.82,3610 5182.82,3245 1929.32,3245 1705,3023.69
GND on Third Layer "GND_L03_P075" (solid, pour order 75): 3731.74,2832.79 3461.74,2562.79 3461.74,22.5 1745,22.5 1745,3015 1957.79,3227.79 3946.74,3227.79 4301.74,3582.79 5201.74,3582.79 5206.74,3577.79 5206.74,3277.79 4671.74,3277.79 4226.74,2832.79
GND on Third Layer "GND_L03_P074" (solid, pour order 74): 3494.24,2575.35 3709.85,2787.79 4209.24,2787.79 4569.24,3142.79 4569.24,3567.79 5194.24,3567.79 5194.24,22.91 3494.24,28.01
GND on Third Layer "GND_L03_P077" (solid, pour order 77): 5194.24,4122.79 4676.8,4646.97 89.24,4651.46 89.24,3652.79 4184.24,3652.79 4564.24,3272.79 5194.24,3272.79

## Other copper
Top Layer:
  pour cut-out: 1038.75,4145 1160,4145 1190,4175 1390,4175 1390,4045 1355,4010 1170,4010 1140,4040 932.5,4040 929.22,4043.28 929.22,4145
  pour cut-out: 385,3960 550,3960 550,4020 385,4020
  pour cut-out: 2120,4320 2415,4320 2415,4225 2120,4225
  pour cut-out: 3175,3821.22 3282.36,3821.22 3284.33,3823.19 3285,3822.52 3285,3765 3175,3765

## Silkscreen, mask and mechanical layers (free items; w line width, h text height)
Top Overlay:
  drawing of 2357 lines, arcs and shapes, not listed
  text "GND" at 17,4568 h50 r270
  text "GND" at 1762,4567 h30
  text "Power Distribution Board Mk 3" at 3165,4547.59 h200
  text "SDA" at 2287,4547 h30
  text "T-" at 2677,4547 h30
  text "T+" at 2677,4472 h30
  text "SCL" at 1762,4457 h30
  text "3.3V" at 2287,4457 h30
  text "Vin" at 22,4393 h50 r270
  text "SWDIO" at 3793,4247 h30 r90
  text "GND" at 4118,4237 h30 r90
  text "NRST" at 3793,4077 h30 r90
  text "SWCLK" at 4118,4032 h30 r90
  text "GND" at 4559,3351 h120 r90
  text "Vin" at 4554,2946 h120 r90
  text "3.3V" at 402,712 h50
  text "5V" at 1647,702 h50
  text "12V" at 3407,702 h50
  text "GND" at 407,612 h50
  text "GND" at 1642,597 h50
  text "GND" at 3402,597 h50
  text "5V" at 1632,152 h50
  text "12V" at 3397,152 h50
  text "3.3V" at 397,137 h50
  text "GND" at 1627,47 h50
  text "GND" at 3392,47 h50
  text "GND" at 392,42 h50
Bottom Overlay:
  drawing of 515 lines, arcs and shapes, not listed
  text "CB HJ NK MK SK LL JN JN SP HS KS AZ" at 4875,4365 h60
  text "*Pillsbury Doughboard Mk 3" at 5209.45,4205 h200 r90
Outline (Mech4):
  the board outline again, w10

## Text inside footprints (layer, text, board x,y; h text height)
C10: Top Overlay "+" at 1311.57,1600 h59.06
C11: Top Overlay "+" at 1310,1180 h59.06
C20: Top Overlay "+" at 3065,1610 h59.06
C21: Top Overlay "+" at 3065,1185 h59.06
C30: Top Overlay "+" at 4500,1710 h59.06
C31: Top Overlay "+" at 4500,1290 h59.06
P1: Top Overlay "1" at 3865,4330 h50 r270; Top Overlay "2" at 3965,4350 h50 r270; Top Overlay "4" at 3965,4090 h50 r270; Top Overlay "3" at 3865,4090 h50 r270
U1: Top Overlay "*" at 757,2333.43 h50
U2: Top Overlay "*" at 2517,2268.43 h50
U3: Top Overlay "*" at 3995,2265 h50